# Altium PCB TTLto485.PcbDoc
Units mil, origin at the board's own origin, x right, y up, seen from the top; angles counter-clockwise.
Board outline 1005 x 440 mil, 2 copper layers (Top Layer, Bottom Layer); 13 components, 10 nets, 40 pads, 19 vias.
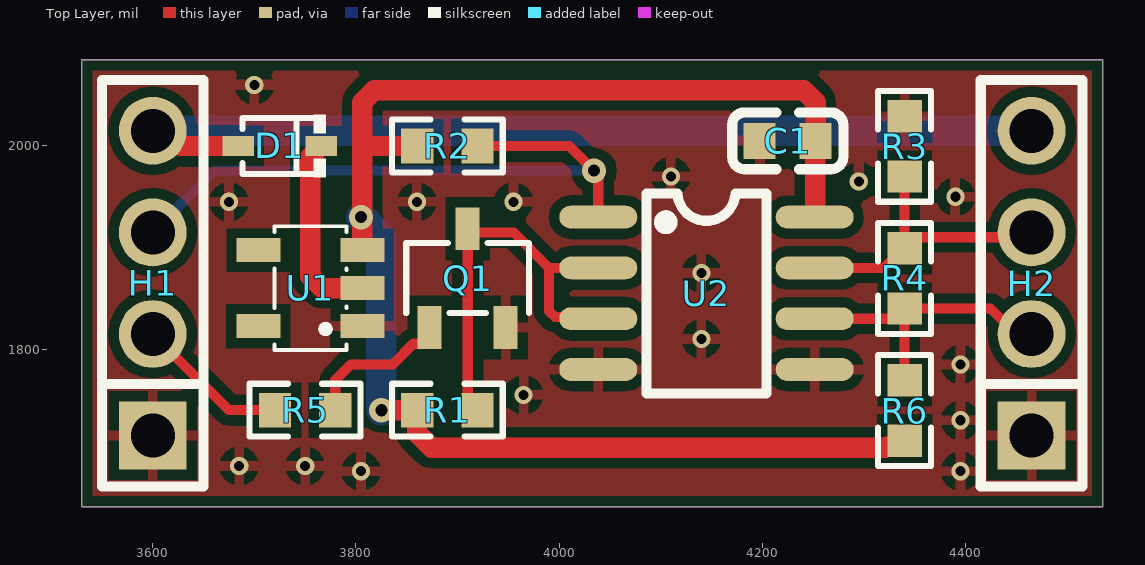
[diagram p0: Top Layer view]
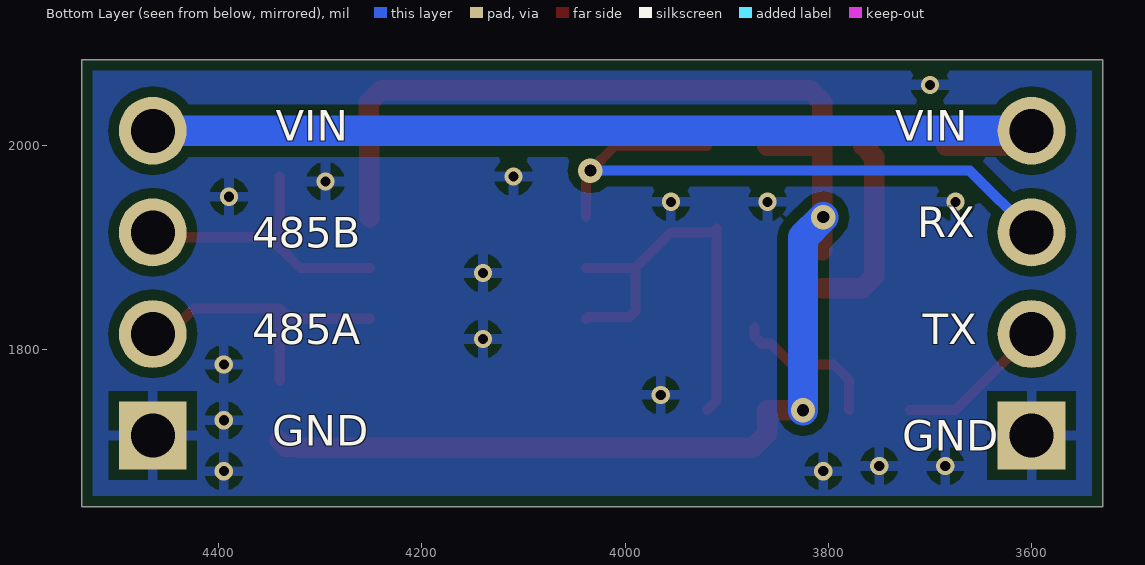
[diagram p1: Bottom Layer view, seen from below]

## Layer stack, top to bottom
Top Solder: solder mask 0.4, Solder Resist, Dk 3.5
Top Layer: signal copper 1.4
Dielectric 1: dielectric 12.6, FR-4, Dk 4.8
Bottom Layer: signal copper 1.4
Bottom Solder: solder mask 0.4, Solder Resist, Dk 3.5

## Board outline
3530,1645 4535,1645 4535,2085 3530,2085

## Design rules (kind name [scope] priority, off if disabled: settings)
Clearance [All] p1: gap=10 ignorepadtopadclearanceinfootprint=TRUE except(0: Arc-Hole Track-Hole SMDPad-Hole THPad-Hole Via-Hole Fill-Hole Poly-Hole Region-Hole Text-Hole)
ComponentClearance [All] p1: gap=0 collisioncheckmode=3 verticalgap=10 showdistances=FALSE
MinimumSolderMaskSliver [All] p1: minsoldermaskwidth=0
PolygonConnect [All] p1: connectstyle=Relief reliefconductorwidth=10 reliefentries=4 polygonreliefangle="90 Angle" airgapwidth=10
RoutingVias [All] p1: holewidth=10 width=20 viastyle="Through Hole" minholewidth=6 minwidth=10 maxholewidth=28 maxwidth=50
SilkToSilkClearance [All] p1: silktosilkclearance=0
SilkToSolderMaskClearance [IsPad] p1: minsilkscreentomaskgap=0 clearancetoexposedcopper=TRUE
SolderMaskExpansion [All] p1: expansion=4 istentingtop=FALSE
Width [All] p1: maxlimit=100 minlimit=6 preferedwidth=10
26 further rules are at their usual default settings.

## Classes and differential pairs
component class TTLto485: C1 H1 H2 Q1 R1 R2 R3 R4 R5 R6 U1 U2

## Components (designator, comment, footprint, x,y, rotation, side; value= is the part's Value field where it differs from the comment)
C1 "10uF" C0603 4225,2005 r180 top value=100nF
D1 "1n4148ws_c7420319" SOD-323_L1.7-W1.3-LS2.5-FD 3725,2000 r0 top
H1 "pz254v-11-04p" HDR-TH_4P-P2.54-V-M 3600,1865 r90 top
H2 "pz254v-11-04p" HDR-TH_4P-P2.54-V-M 4465,1865 r90 top
Q1 "Q3904" SOT-23-3_L2.9-W1.6-P1.90-LS2.8-BR 3910,1870 r270 top
R1 "1K" R0603 3890,1740 r180 top value=1kΩ
R2 "1K" R0603 3890,2000 r180 top value=1kΩ
R3 "4.7K" R0603 4340,1999.7 r270 top value=1kΩ
R4 "120" R0603 4340,1869.7 r270 top value=1kΩ
R5 "1K" R0603 3750,1740 r180 top value=1kΩ
R6 "4.7K" R0603 4340,1739.7 r270 top value=1kΩ
U1 "tlv70433dbvr" SOT-23-5_L3.0-W1.7-P0.95-LS2.8-BR 3755,1860 r0 top
U2 "sp3485en-l/tr" SOIC-8_L5.0-W4.0-P1.27-LS6.0-BL 4145,1855 r270 top

## Footprints (in the part's own frame and the unit in brackets; to place one, negate y for a bottom-side part, rotate by r counter-clockwise, add the part's x,y. Pads: shape width x height; smd on the part's side, far side on the other; paste and mask are expansions set on the pad)
C0603 [mil]
  rect 31.5x35.4 smd: 1(-27.5,0) 2(27.6,0)
  silkscreen extent -55,-28 55,28
HDR-TH_4P-P2.54-V-M [mil]
  rect 66.9x66.9 hole 43.3: 1(-150,0)
  round 66.9 hole 43.3: 2(-50,0) 3(50,0) 4(150,0)
  silkscreen extent -200,-50 200,50
R0603 [mil]
  rect 31.8x34 smd paste-3937 mask+2: 1(-29.6,0) 2(29.7,0)
  silkscreen extent -54,-26 55,26
SOD-323_L1.7-W1.3-LS2.5-FD [mil]
  rect 30.7x19.7 smd: 1(-40.9,0) 2(40.9,0)
  silkscreen extent -36,-31 46,31
SOIC-8_L5.0-W4.0-P1.27-LS6.0-BL [mil]
  oval 22.4x76.8 smd: 1(-75,-106.5) 2(-25,-106.5) 3(25,-106.5) 4(75,-106.5) 5(75,106.5) 6(25,106.5) 7(-25,106.5) 8(-75,106.5)
  silkscreen extent -98,-59 99,59
SOT-23-3_L2.9-W1.6-P1.90-LS2.8-BR [mil]
  rect 42.1x23.6 smd: 1(48.6,-37.4) 2(48.6,37.4) 3(-48.6,0)
  silkscreen extent -35,-61 35,61
SOT-23-5_L3.0-W1.7-P0.95-LS2.8-BR [mil]
  rect 43.3x23.6 smd: 1(51.2,-37.4) 2(51.2,0) 3(51.2,37.4) 4(-51.1,37.4) 5(-51.1,-37.4)
  silkscreen extent -35,-61 36,61

## Part data
C1: library part C, "容值:100nF;精度:±10%;额定电压:50V;温度系数:X7R;", JLCPCB Part Class="Extended Part", LCSC Part Name="100nF ±10% 50V", Manufacturer=SAMSUNG(三星), ManufacturerPart=CL10B104KB8NNNC, Temperature Coefficient=X7R, Tolerance=±10%, Voltage Rating=50V, AddInBom=yes, ConvertToPcb=yes, Datasheet=https://item.szlcsc.com/datasheet/CL10B104KB8NNNC/1943.html, FootprintName=C0603, ModelId=ac125912035d415993ca9572d50418b1, ModelName=C0603_L1.6-W0.8-H0.8, ModelTransform=62.992,31.496,0,0,0,0,0,0,0, Supplier=LCSC, Supplier Footprint=0603, SupplierPart=C1591, Symbol=CL10B104KB8NNNC
D1: "二极管配置:独立式;整流电流:150mA;直流反向耐压(Vr):100V;正向压降(Vf):1.25V@150mA;反向恢复时间(Trr):4ns;", Current - Rectified=150mA, JLCPCB Part Class="Extended Part", LCSC Part Name="100V 150mA", Manufacturer=R+O(宏嘉诚), ManufacturerPart=1N4148WS, Non-Repetitive Peak Forward Surge Current=2A, Operating Junction Temperature Range=-55℃~+150℃, Pd - Power Dissipation=200mW, Reverse Leakage Current (Ir)=1uA@75V, Voltage - DC Reverse(Vr)=100V, Voltage - Forward(Vf@If)=1.25V@150mA, AddInBom=yes, ConvertToPcb=yes, Datasheet=https://item.szlcsc.com/datasheet/1N4148WS/8397141.html, Diode Configuration=独立式, FootprintName=SOD-323_L1.7-W1.3-LS2.5-FD, ModelId=0f2f330c645944df9245ac3c3fec3456, ModelName=SOD-323_L1.7-W1.3-LS2.5-FD, ModelTransform=98.425,49.2125,0,180,0,0,0,0,0, Reverse Recovery Time (trr)=4ns, Supplier=LCSC, Supplier Footprint=SOD-323, SupplierPart=C7420319, Symbol=1N4148WS_C7420319
H1 H2: "插针结构:1x4P;间距:2.54mm;行距:-;圆针/方针:方针;安装方式:直插;排数:单排;总PIN位数:4P;额定电流:3A;额定电压:250V;配合针长度:6mm;塑高:2.5mm;端接针长度:3mm;触头材质:-;工作温度:-40℃~+105℃;颜色:黑色;", Color=黑色, Current Rating=3A, JLCPCB Part Class="Extended Part", LCSC Part Name="1x4P 间距:2.54mm 方针 直插", Manufacturer=XFCN(兴飞), ManufacturerPart=PZ254V-11-04P, Operating Temperature=-40℃~+105℃, Voltage Rating (Max)=250V, AddInBom=yes, Circluar Pins/Square Pins=方针, Contact Material=-, ConvertToPcb=yes, Datasheet=https://item.szlcsc.com/datasheet/PZ254V-11-04P/2801085.html, FootprintName=HDR-TH_4P-P2.54-V-M, Insulation Height=2.5mm, Length of End Connection Pin=3mm, Length of Mating Pin=6mm, ModelId=112f4d05e8d64e99ab9a333894bea4f9, ModelName=HDR-TH_4P-P2.54-M-LI-1X4P, ModelTransform=399.999,104.7242,0,0,0,0,0,0,-118.11, Mounting Type=直插, Number of Pins=4P, Number of Rows=单排, Pin Structure=1x4P, Pitch=2.54mm, Row Spacing=-, Supplier=LCSC, Supplier Footprint=插件,P=2.54mm, SupplierPart=C2691448, Symbol=PZ254V-11-04P_C2691448
Q1: "晶体管类型:NPN;集电极电流(Ic):200mA;集射极击穿电压(Vceo):40V;耗散功率(Pd):225mW;直流电流增益(hFE):40@0.1mA,1.0V;", Collector - Emitter Voltage VCEO=40V, Current - Collector Cutoff=50nA, Current - Collector(Ic)=200mA, DC Current Gain=40@0.1mA,1.0V, JLCPCB Part Class="Extended Part", LCSC Part Name="NPN 电流:200mA 电压:40V", Manufacturer=onsemi(安森美), ManufacturerPart=MMBT3904LT1G, Operating Temperature=-55℃~+150℃, Pd - Power Dissipation=225mW, Transition frequency(fT)=300MHz, AddInBom=yes, ConvertToPcb=yes, Datasheet=https://item.szlcsc.com/datasheet/MMBT3904LT1G/82615.html, FootprintName=SOT-23-3_L2.9-W1.6-P1.90-LS2.8-BR, ModelId=89cb27a44ab2466697082bb9fd73a7d0, ModelName=SOT-23-3L_L2.9-W1.6-H1.1-LS2.8-P0.95, ModelTransform=114.173,110.236,0,90,0,0,0,0,0, Supplier=LCSC, Supplier Footprint=SOT-23, SupplierPart=C81464, Symbol=MMBT3904LT1G, type=NPN, Vce Saturation(VCE(sat))=200mV
R1 R2 R3 R4 R5 R6: library part R, "电阻类型:厚膜电阻;阻值:1kΩ;精度:±1%;功率:100mW;工作电压:75V;温度系数:±100ppm/℃;", JLCPCB Part Class="Extended Part", LCSC Part Name="1kΩ ±1% 100mW 厚膜电阻", Manufacturer=FOJAN(富捷), ManufacturerPart=FRC0603F1001TS, Operating Temperature=-55℃~+155℃, Power(Watts)=100mW, Temperature Coefficient=±100ppm/℃, Tolerance=±1%, Voltage-Supply(Max)=75V, AddInBom=yes, ConvertToPcb=yes, FootprintName=R0603, ModelId=fc143cca1e79419f9cd78b61e9279f08, ModelName=R0603, ModelTransform=31.8897,63.7794,0,90,0,0,0,0,0, Supplier=LCSC, Supplier Footprint=0603, SupplierPart=C2907002, Symbol=FRC0603F1001TS, type=厚膜电阻
U1: "输出极性:正极;工作电压:24V;输出电压:3.3V;输出电流:150mA;电源纹波抑制比(PSRR):60dB@(100kHz);输出类型:固定;", JLCPCB Part Class="Extended Part", LCSC Part Name="3.3V 150mA 24V", Manufacturer=TI(德州仪器), ManufacturerPart=TLV70433DBVR, Operating Temperature=-40℃~+125℃@(Tj), Output Current=150mA, Output Voltage=3.3V, Power Supply Rejection Ratio (PSRR)=60dB@(100kHz), standby current=3.2uA, Voltage - Supply=24V, Voltage Dropout=850mV@(100mA), AddInBom=yes, ConvertToPcb=yes, Datasheet=https://www.ti.com/cn/lit/ds/symlink/tlv704.pdf, Features=短路保护；过流保护；使能控制, FootprintName=SOT-23-5_L3.0-W1.7-P0.95-LS2.8-BR, ModelId=0a2a1b8f50944f73965918ad6e5fe167, ModelName=SOT-23-5_L2.9-W1.6-H1.1-LS2.8-P0.95, ModelTransform=114.173,109.636,0,180,0,0,0,0,0, Noise=-, Number of Outputs=1, Output Configuration=正极, Output Type=固定, Supplier=LCSC, Supplier Footprint=SOT-23-5, SupplierPart=C94917, Symbol=TLV70433DBVR
U2: "类型:收发器;数据速率:10Mbps;", JLCPCB Part Class="Basic Part", LCSC Part Name="SP3485 +3.3V低功耗半双工RS-485收发器，数据速率10Mbps", Manufacturer=MaxLinear(迈凌), ManufacturerPart=SP3485EN-L/TR, Operating Temperature=-40℃~+85℃, Quiescent Supply Current=2mA, Voltage - Supply=3.3V, AddInBom=yes, Communication Mode=半双工, ConvertToPcb=yes, Data Rate=10Mbps, Datasheet=https://item.szlcsc.com/datasheet/SP3485EN-L%252FTR/9482.html, ESD Protect=-, Features=Tx/Rx启用；使能关断；过流保护, FootprintName=SOIC-8_L5.0-W4.0-P1.27-LS6.0-BL, ModelId=7abc64c95a1a4a04a4ef38f9097c870b, ModelName=SOIC-8_L5.0-W4.0-P1.27-LS6.0-BL, ModelTransform=192.913,236.22,0,0,0,0,0,0,0, Number of Drivers=1, Number of Nodes=32, Number of Receivers=1, Supplier=LCSC, Supplier Footprint=SOIC-8, SupplierPart=C8963, Symbol=SP3485EN-L/TR, type=收发器

## Via types
v1: diameter 18, hole 10, Top Layer to Bottom Layer, 16 vias
v2: diameter 24, hole 12, Top Layer to Bottom Layer, 3 vias

## Nets (pads, with @x,y where several pads share a name; then routed paths per layer and width w, separated by ;. In a path a pad name is that pad's centre, name@x,y a point inside that pad or via, vN(x,y) a via of type N, cw(c..) or ccw(c..) an arc to the next point about the centre after c; other vN are vias at no path point)
485_A: H2.2 R4.2 R6.1 U2.6 | length 298.7
  Top Layer w10: U2.6 4330,1830 R4.2 ; R6.1 R4.2 ; H2.2 4449.6,1815 4424.6,1840 R4.2
485_B: H2.3 R3.2 R4.1 U2.7 | length 298.7
  Top Layer w10: U2.7 4319.6,1880 4338.9,1899.3 R4.1 ; R3.2 R4.1 ; H2.3 4460.2,1910.2 4350.9,1910.2 R4.1
GND: C1.2 H1.1 H2.1 Q1.2 R3.1 U1.1 U2.4 U2.5
  other v1: 3805,1680 4395,1680 3685,1685 3750,1685 4395,1730 3965,1755 4395,1785 4140,1810 4140,1875 3675,1945 3860,1945 3955,1945 4390,1950 4295,1965 4110,1970 3700,2060
NetD1_2: D1.2 U1.2 | length 191.9
  Top Layer w20: D1.2 3760.7,2000 3760.55,1999.85 3760.55,1994.65 3755,1989.1 3755,1871.72 3766.72,1860 U1.2
NetQ1_1: Q1.1 R5.1 | length 149.5
  Top Layer w10: R5.1 3779.6,1769.6 3795,1785 3836.2,1785 3856.55,1805.35 3865.8,1805.35 3872.6,1812.15 Q1.1
NetQ1_3: Q1.3 R1.1 U2.2 U2.3 | length 421.2
  Top Layer w10: R1.1 3910,1749.6 Q1.3 3913.6,1915 3955,1915 3990,1880 ; U2.3 4036.89,1831.61 3995.86,1831.61 3990,1837.47 3990,1880 ; U2.2 3990,1880
RX: H1.3 R2.1 U2.1 | length 631.6
  Top Layer w10: R2.1 4010,2000 v2(4034.25,1975.75) 4038.5,1971.5 U2.1
  Bottom Layer w10: H1.3 3660.75,1975.75 v2(4034.25,1975.75)
TX: H1.2 R5.2 | length 151.4
  Top Layer w10: H1.2 3675,1740 R5.2
V3.3: C1.1 R1.2 R2.2 R6.2 U1.3 U2.8 | length 1516.8
  Top Layer w20: U1.3 3806.2,1995 ; v2(3825,1740) R1.2 3860.14,1739.84 3860.14,1717.3 3874.44,1703 4321.28,1703 4322.38,1704.1 4334.1,1704.1 R6.2 ; R2.2 3811.2,2000 3806.2,1995 ; U2.8 4252,1930.5 4252,2004.5 C1.1 4252.5,2043.28 4240.78,2055 3817.92,2055 3806.2,2043.28 3806.2,1995
  Bottom Layer w30: v2(3805,1930) 3825,1910 v2(3825,1740)
VIN: D1.1 H1.4 H2.4 | length 955.3
  Top Layer w20: H1.4 3612.69,2015 3627.69,2000 D1.1
  Bottom Layer w30: H1.4 H2.4
pads on no net: U1.4 U1.5

## Polygon pours and split planes (outlines as drawn)
GND on Bottom Layer "BOTTOM_GND" (solid, remove dead copper, pour order 0): 3530,2085 3530,1645 4535,1645 4535,2085
GND on Top Layer "TOP_GND" (solid, remove dead copper, pour order 1): 3530,2085 4535,2085 4535,1645 3530,1645

## Keep-outs
Keep-Out Layer:
  the board outline again, w1

## Silkscreen, mask and mechanical layers (free items; w line width, h text height)
Bottom Overlay:
  text "VIN" at 3733.98,2005 h30
  text "VIN" at 4343.98,2005 h30
  text "RX" at 3712.32,1910 h30
  text "485B" at 4367.31,1900 h30
  text "TX" at 3707.32,1805 h30
  text "485A" at 4367.31,1805 h30
  text "GND" at 4347.32,1705 h30
  text "GND" at 3727.32,1700 h30